# Altium PCB NB3000XN.PcbDoc (part 53 of 71)
Units mil, origin at the board's own origin, x right, y up, seen from the top; angles counter-clockwise.
Board outline 9527.56 x 6929.77 mil, 6 copper layers (Top Layer, GND+SHIELD, MidLayer1, MidLayer2, P2 - 3V3+5V0, Bottom Layer), stack 62.375 mil thick; 832 components, 1027 nets, 4655 pads, 4981 vias.
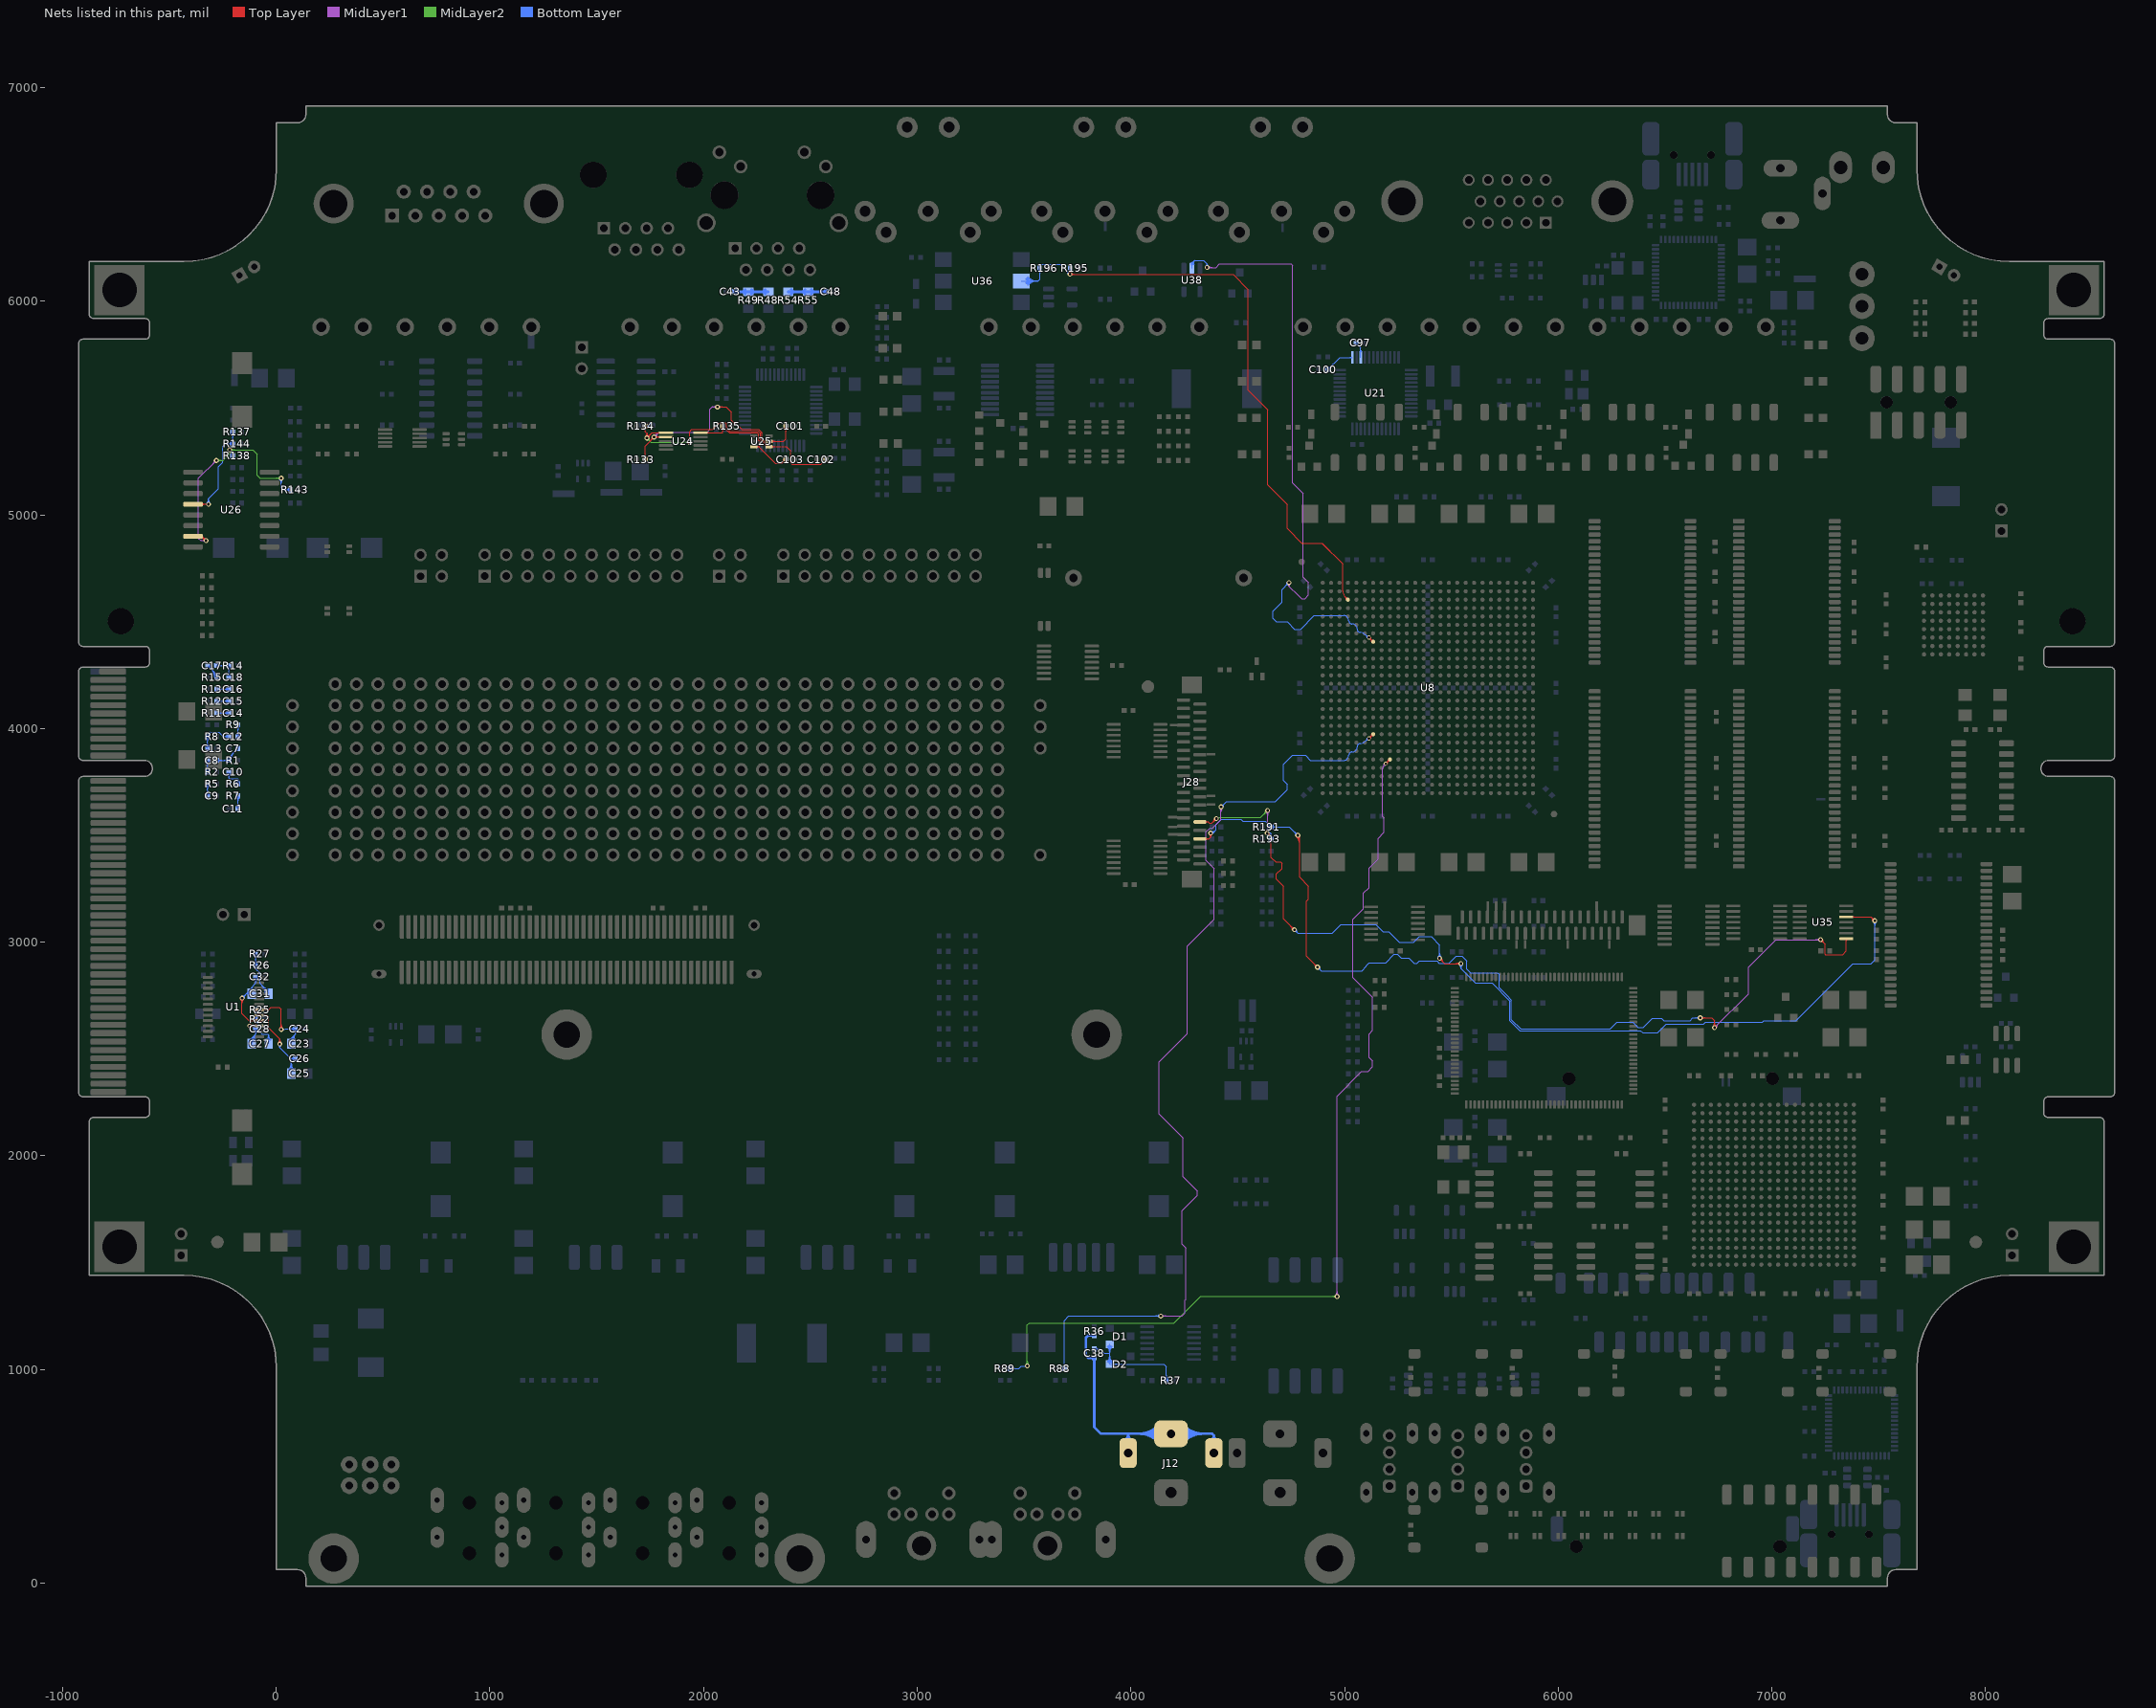
[diagram p57: the nets of this part, all layers, seen from the top]

## Via types
v1: diameter 23, hole 11.81, Top Layer to Bottom Layer, 3672 vias
v2: diameter 26, hole 11.81, Top Layer to Bottom Layer, 461 vias
v3: diameter 19, hole 11.81, Top Layer to Bottom Layer, tented both sides, 396 vias
v4: diameter 23.62, hole 11.81, Top Layer to Bottom Layer, 288 vias
v5: diameter 20, hole 11.81, Top Layer to Bottom Layer, 91 vias
v6: diameter 23, hole 11.81, Top Layer to Bottom Layer, tented both sides, 50 vias
v7: diameter 31, hole 11.81, Top Layer to Bottom Layer, 15 vias
v8: diameter 27.56, hole 11.81, Top Layer to Bottom Layer, tented both sides, 4 vias
v9: diameter 29, hole 11.81, Top Layer to Bottom Layer, 3 vias
v10: diameter 21, hole 11.81, Top Layer to Bottom Layer, 1 vias

## Nets (pads, with @x,y where several pads share a name; then routed paths per layer and width w, separated by ;. In a path a pad name is that pad's centre, name@x,y a point inside that pad or via, vN(x,y) a via of type N, cw(c..) or ccw(c..) an arc to the next point about the centre after c; other vN are vias at no path point) (continued)
LEDS#.LED7.GREEN: J28.30 R193.2 U35.12 | length 5428
  Top Layer w4: J28.30@4323.39,3562.99 4361.19,3562.99 4367.34,3556.84 4378.66,3556.84 v1(4400.52,3578.71) ; J28.30@4349.67,3558.84 cw(c4359.69,3548.81) 4359.69,3562.99 cw(c4359.69,3577.17) J28.30@4349.67,3567.15 ; v1@4391.02,3578.71 cw(c4368.09,3578.71) 4384.31,3562.49 cw(c4400.52,3546.27) v1@4400.52,3569.21 ; v1@4395.02,3578.71 cw(c4381.75,3578.71) 4391.14,3569.32 cw(c4400.52,3559.93) v1@4400.52,3573.21 ; v1@4637.52,3501.54 cw(c4637.52,3478.61) 4653.74,3494.82 cw(c4669.96,3511.04) v1@4647.02,3511.04 ; v1@4637.52,3505.54 cw(c4637.52,3492.26) 4646.91,3501.65 cw(c4656.3,3511.04) v1@4643.02,3511.04 ; v1(4637.52,3511.04) 4657.19,3491.37 4657.19,3396.73 4678.88,3375.04 4700.9,3375.04 4706.86,3369.08 4706.86,3345.37 4681.86,3320.37 4681.86,3296.04 4715.19,3262.71 4715.19,3108.37 v1(4765.19,3058.37) ; v1@4755.69,3058.37 ccw(c4732.76,3058.37) 4748.97,3074.59 ccw(c4765.19,3090.81) v1@4765.19,3067.87 ; v1@4759.69,3058.37 ccw(c4746.41,3058.37) 4755.8,3067.76 ccw(c4765.19,3077.15) v1@4765.19,3063.87 ; v1@5445,2915.5 cw(c5445,2893.02) 5460.9,2908.92 ; v1@5445,2919.5 cw(c5445,2906.68) 5454.07,2915.74 ; v1(5445,2925) 5445,2924.81 5469.77,2900.04 v1(5544.52,2900.04) ; v1@5450.5,2925 ccw(c5464.23,2925) 5454.52,2915.29 ; v1@5454.5,2925 ccw(c5477.89,2925) 5461.35,2908.46 ; v1@5537.81,2893.32 ccw(c5521.59,2877.11) 5521.59,2900.04 ccw(c5521.59,2922.98) v1@5537.81,2906.76 ; v1@5540.64,2896.15 ccw(c5531.25,2886.76) 5531.25,2900.04 ccw(c5531.25,2913.32) v1@5540.64,2903.93 ; U35.12@7348.5,3118.82 7463.75,3118.82 v1(7481.86,3100.71) ; U35.12@7377.81,3115.99 cw(c7384.64,3109.16) 7384.64,3118.82 cw(c7384.64,3128.48) U35.12@7377.81,3121.65 ; v1@7472.36,3100.71 ccw(c7449.42,3100.71) 7465.64,3116.93 ccw(c7481.86,3133.14) v1@7481.86,3110.21 ; v1@7476.36,3100.71 ccw(c7463.08,3100.71) 7472.47,3110.1 ccw(c7481.86,3119.49) v1@7481.86,3106.21
  MidLayer1 w4: v1@4630.81,3517.76 ccw(c4608.15,3540.41) 4640.19,3540.41 ; v1@4633.47,3609.99 cw(c4617.26,3593.77) 4640.19,3593.77 cw(c4663.13,3593.77) v1@4646.91,3609.99 ; v1@4633.64,3514.93 ccw(c4617.81,3530.76) 4640.19,3530.76 ; v1@4636.3,3612.82 cw(c4626.91,3603.43) 4640.19,3603.43 cw(c4653.47,3603.43) v1@4644.08,3612.82 ; v1(4637.52,3511.04) 4640.19,3513.71 v1(4640.19,3616.71) ; 4640.19,3527.54 ccw(c4654.02,3527.54) v1@4644.24,3517.76
  MidLayer2 w4: v1(4400.52,3578.71) 4405.19,3583.37 4606.86,3583.37 v1(4640.19,3616.71) ; v1@4630.69,3616.71 cw(c4607.76,3616.71) 4623.97,3600.49 cw(c4640.19,3584.27) v1@4640.19,3607.21 ; v1@4634.69,3616.71 cw(c4621.41,3616.71) 4630.8,3607.32 cw(c4640.19,3597.93) v1@4640.19,3611.21
  Bottom Layer w4: v1(4637.52,3511.04) 4654.19,3511.04 ; v1@4645.7,3506.2 cw(c4654.19,3501.17) 4654.19,3511.04 ; v1@4645.7,3515.88 ccw(c4654.19,3520.91) 4654.19,3511.04 ; R193.2@4649.59,3490.21 ccw(c4633.68,3506.12) 4656.18,3506.12 ccw(c4678.68,3506.11) R193.2@4662.77,3490.21 ; R193.2@4652.42,3487.38 ccw(c4643.34,3496.46) 4656.18,3496.46 ccw(c4669.02,3496.46) R193.2@4659.94,3487.38 ; R193.2@4656.18,3483.12 4656.18,3509.05 4654.19,3511.04 ; v1@4765.19,3048.87 cw(c4765.19,3025.94) 4781.41,3042.16 cw(c4797.63,3058.37) v1@4774.69,3058.37 ; v1@4765.19,3052.87 cw(c4765.19,3039.6) 4774.58,3048.99 cw(c4783.97,3058.37) v1@4770.69,3058.37 ; v1(4765.19,3058.37) 4781.86,3041.71 4941.9,3041.71 4983.56,3083.37 5146.54,3083.37 5179.88,3050.04 5206.86,3050.04 5256.86,3000.04 5323.52,3000.04 5341.48,3018 5349.36,3025.87 5405.77,3025.87 5445,2986.65 v1(5445,2925) ; v1@5438.28,2931.72 ccw(c5422.06,2947.93) 5445,2947.93 ccw(c5467.93,2947.93) v1@5451.72,2931.72 ; v1@5441.11,2928.89 ccw(c5431.72,2938.28) 5445,2938.28 ccw(c5458.28,2938.28) v1@5448.89,2928.89 ; v1@5537.81,2893.32 cw(c5521.59,2877.11) 5544.52,2877.11 cw(c5567.46,2877.11) v1@5551.24,2893.32 ; v1@5540.64,2896.15 cw(c5531.25,2886.76) 5544.52,2886.76 cw(c5557.8,2886.76) v1@5548.41,2896.15 ; v1(5544.52,2900.04) 5544.52,2875.48 5611.63,2808.37 5690.19,2808.37 5773.52,2725.04 5773.52,2633.37 5821.19,2585.71 6385.48,2585.71 6395.48,2575.71 6445,2575.71 6465.86,2575.71 6506.86,2616.71 6680.52,2616.71 6690.19,2626.37 6956.94,2626.37 6963.94,2633.37 7112.21,2633.37 7378.88,2900.04 7465.19,2900.04 7481.86,2916.71 v1(7481.86,3100.71) ; v1@7475.14,3093.99 cw(c7458.92,3077.77) 7481.86,3077.77 cw(c7504.79,3077.77) v1@7488.57,3093.99 ; v1@7477.97,3096.82 cw(c7468.58,3087.43) 7481.86,3087.43 cw(c7495.14,3087.43) v1@7485.75,3096.82
LEDS#.LED7.RED: J28.34 R191.2 U35.8 | length 5342.9
  Top Layer w4: J28.34@4323.39,3484.25 4365.52,3484.25 4373.52,3492.25 ; J28.34@4349.67,3480.1 cw(c4359.69,3470.07) 4359.69,3484.25 cw(c4359.69,3498.43) J28.34@4349.67,3488.41 ; v1@4367.89,3503.39 cw(c4359.7,3492.25) 4373.52,3492.25 ; v1(4373.52,3511.04) 4373.52,3492.25 ; v1@4379.16,3503.39 ccw(c4387.35,3492.25) 4373.52,3492.25 ; v1@4775.14,3493.32 cw(c4738.8,3456.99) 4790.19,3456.99 ; v1@4777.97,3496.15 cw(c4748.46,3466.64) 4790.19,3466.64 ; v1@4780.8,3498.98 cw(c4758.12,3476.3) 4790.19,3476.3 ; v1(4781.86,3500.04) 4790.19,3491.71 4790.19,3304.02 4831.52,3262.69 4831.52,3201.69 4822.86,3193.02 4822.86,2934.04 v1(4873.52,2883.37) ; v1@4783.62,3501.81 cw(c4767.78,3485.96) 4790.19,3485.96 ; v1@4864.02,2883.37 ccw(c4841.09,2883.37) 4857.31,2899.59 ccw(c4873.52,2915.81) v1@4873.52,2892.87 ; v1@4868.02,2883.37 ccw(c4854.75,2883.37) 4864.14,2892.76 ccw(c4873.52,2902.15) v1@4873.52,2888.87 ; v1(6665.19,2645.71) 6719.29,2645.71 6731.86,2633.14 v1(6731.86,2600.04) ; v1@6669.08,2641.82 cw(c6678.47,2632.43) 6678.47,2645.71 cw(c6678.47,2658.99) v1@6669.08,2649.6 ; v1@6671.91,2638.99 cw(c6688.13,2622.77) 6688.13,2645.71 cw(c6688.13,2668.64) v1@6671.91,2652.43 ; v1@6725.14,2606.76 ccw(c6708.92,2622.98) 6731.86,2622.98 ccw(c6754.79,2622.98) v1@6738.57,2606.76 ; v1@6727.97,2603.93 ccw(c6718.58,2613.32) 6731.86,2613.32 ccw(c6745.14,2613.32) v1@6735.75,2603.93 ; v1@7228.19,3002.54 cw(c7228.19,2979.61) 7244.41,2995.82 cw(c7260.63,3012.04) v1@7237.69,3012.04 ; v1@7228.19,3006.54 cw(c7228.19,2993.26) 7237.58,3002.65 cw(c7246.97,3012.04) v1@7233.69,3012.04 ; v1(7228.19,3012.04) 7248.52,2991.71 7248.52,2943.37 7250.19,2941.71 7331.86,2941.71 7348.52,2958.37 U35.8@7348.5,3016.46 ; U35.8@7345.68,3013.63 cw(c7338.8,3006.75) 7348.52,3006.75 ; 7348.52,3006.85 cw(c7358.11,3006.85) U35.8@7351.33,3013.63 ; U35.8@7348.5,3016.46 7348.52,3016.71 U35.8@7348.5,3016.46
  MidLayer1 w4: v1(6731.86,2600.04) 6890.19,2758.37 6890.19,2882.77 7019.46,3012.04 v1(7228.19,3012.04) ; v1@6731.86,2605.54 ccw(c6731.86,2618.82) 6741.25,2609.43 ccw(c6750.64,2600.04) v1@6737.36,2600.04 ; v1@6731.86,2609.54 ccw(c6731.86,2632.48) 6748.07,2616.26 ccw(c6764.29,2600.04) v1@6741.36,2600.04 ; v1@7221.47,3005.32 ccw(c7205.26,2989.11) 7205.26,3012.04 ccw(c7205.26,3034.98) v1@7221.47,3018.76 ; v1@7224.3,3008.15 ccw(c7214.91,2998.76) 7214.91,3012.04 ccw(c7214.91,3025.32) v1@7224.3,3015.93
  Bottom Layer w4: v1(4373.52,3511.04) 4384.52,3511.04 4398.52,3525.04 ; v1@4374.02,3512.46 ccw(c4378.92,3526.59) 4389.5,3516.01 ; v1@4375.33,3516.24 ccw(c4381.25,3533.29) 4394.01,3520.53 ; v1@4376.64,3520.02 ccw(c4383.57,3539.99) 4398.52,3525.04 ; 4639.43,3556.75 ccw(c4656.18,3573.5) R191.2@4656.18,3549.81 ; 4640.62,3555.56 cw(c4625.55,3540.49) R191.2@4646.86,3540.49 ; R191.2@4646.26,3549.92 ccw(c4656.18,3559.84) R191.2@4656.18,3545.81 ; R191.2@4647.45,3548.73 cw(c4639.21,3540.49) R191.2@4650.86,3540.49 ; R191.2@4659.94,3536.24 cw(c4669.02,3527.16) 4669.02,3540 cw(c4669.02,3552.84) R191.2@4659.94,3543.76 ; R191.2@4662.77,3533.41 cw(c4678.68,3517.5) 4678.68,3540 cw(c4678.68,3562.5) R191.2@4662.77,3546.59 ; v1@4772.36,3500.04 ccw(c4749.42,3500.04) 4765.64,3516.26 ccw(c4781.86,3532.48) v1@4781.86,3509.54 ; v1@4776.36,3500.04 ccw(c4763.08,3500.04) 4772.47,3509.43 ccw(c4781.86,3518.82) v1@4781.86,3505.54 ; v1(4781.86,3500.04) 4741.9,3540 R191.2@4656.18,3540 4629.47,3566.71 4523.52,3566.71 4515.19,3575.04 4423.52,3575.04 4398.52,3550.04 4398.52,3525.04 ; v1@4873.52,2873.87 cw(c4873.52,2850.94) 4889.74,2867.16 cw(c4905.96,2883.37) v1@4883.02,2883.37 ; v1@4873.52,2877.87 cw(c4873.52,2864.6) 4882.91,2873.99 cw(c4892.3,2883.37) v1@4879.02,2883.37 ; v1(4873.52,2883.37) 4890.52,2866.37 5081.56,2866.37 5102.81,2887.62 5102.81,2891.1 5114.52,2902.81 5192.62,2902.81 5232.62,2942.81 5247.38,2942.81 5265.31,2924.88 5302.27,2924.88 5325.61,2901.54 5340.11,2901.54 5350.36,2911.79 5433.46,2911.79 5443.06,2902.19 5489.36,2902.19 5522.17,2935 5550,2935 5573.19,2911.81 5573.19,2874.04 5589.86,2857.37 5716.19,2857.37 5723.52,2850.04 5723.52,2786.37 5757.18,2752.72 5781.52,2728.37 5781.52,2636.69 5824.5,2593.71 6243.19,2593.71 6274.52,2625.04 6348.52,2625.04 6373.52,2600.04 6398.52,2600.04 6441.86,2643.37 6442.69,2644.2 6484.34,2644.2 6495.5,2633.04 6617.33,2633.04 6630,2645.71 v1(6665.19,2645.71) ; v1@6658.47,2638.99 ccw(c6642.26,2622.77) 6642.26,2645.71 ccw(c6642.26,2668.64) v1@6658.47,2652.43 ; v1@6661.3,2641.82 ccw(c6651.91,2632.43) 6651.91,2645.71 ccw(c6651.91,2658.99) v1@6661.3,2649.6
LINEAOUT_L: R137.2 R144.1 U26.4 | length 757.1
  Top Layer w4: U26.4@-389.13,5050 -332.81,5050 ; U26.4@-351.46,5046 cw(c-342.13,5037.13) -342.13,5050 cw(c-342.13,5062.87) U26.4@-351.46,5054 ; U26.4@-348.56,5043.24 cw(c-332.81,5028.28) -332.81,5050 ; U26.4@-348.56,5056.76 ccw(c-332.81,5071.72) -332.81,5050 ; -332.77,5050.04 v1(-317.14,5050.04)
  Bottom Layer w4: v1@-323.86,5056.76 ccw(c-340.08,5072.98) -317.14,5072.98 ccw(c-294.21,5072.98) v1@-310.43,5056.76 ; v1@-321.03,5053.93 ccw(c-330.42,5063.32) -317.14,5063.32 ccw(c-303.86,5063.32) v1@-313.25,5053.93 ; v1(-317.14,5050.04) -317.14,5075 -270,5122.14 -270,5225 -250,5245 -250,5320 -237.42,5332.58 R144.1@-203.21,5332.58 R137.2@-203.21,5388.42 ; R144.1@-209.8,5325.99 ccw(c-225.71,5310.08) -225.71,5332.58 ccw(c-225.71,5355.08) R144.1@-209.8,5339.17 ; R144.1@-209.8,5339.66 ccw(c-225.71,5355.57) -203.21,5355.57 ccw(c-180.71,5355.57) R144.1@-196.62,5339.66 ; R137.2@-209.8,5381.33 cw(c-225.71,5365.43) -203.21,5365.43 cw(c-180.71,5365.43) R137.2@-196.62,5381.33 ; R144.1@-206.97,5328.82 ccw(c-216.05,5319.74) -216.05,5332.58 ccw(c-216.05,5345.42) R144.1@-206.97,5336.34 ; R144.1@-206.97,5336.84 ccw(c-216.05,5345.91) -203.21,5345.91 ccw(c-190.37,5345.91) R144.1@-199.45,5336.84 ; R137.2@-206.97,5384.16 cw(c-216.05,5375.08) -203.21,5375.08 cw(c-190.37,5375.08) R137.2@-199.45,5384.16
LINEAOUT_R: R138.2 R143.1 U26.7 | length 1685.2
  Top Layer w4: U26.7@-395,4900 U26.7@-389.13,4900 -348,4900 v1(-328,4880) ; U26.7@-355.67,4894.19 cw(c-355.67,4861.64) v1@-332.66,4884.66 ; U26.7@-355.67,4898.19 cw(c-355.67,4875.3) -339.49,4891.49 ; U26.7@-345.86,4900 ccw(c-340.69,4900) U26.7@-344.34,4896.34 ; v1@-337.5,4880 ccw(c-360.44,4880) -344.22,4896.22 ccw(c-328,4912.43) v1@-328,4889.5 ; v1@-333.5,4880 ccw(c-346.78,4880) -337.39,4889.39 ccw(c-328,4898.78) v1@-328,4885.5
  MidLayer1 w4: v1@-334.72,4873.28 ccw(c-350.94,4857.06) -350.94,4880 ccw(c-350.94,4902.93) v1@-334.72,4886.72 ; v1@-331.89,4876.11 ccw(c-341.28,4866.72) -341.28,4880 ccw(c-341.28,4893.28) v1@-331.89,4883.89 ; v1(-328,4880) -354,4880 -364,4890 -364,5171 v1(-280,5255) ; v1@-289.5,5255 cw(c-312.44,5255) -296.22,5238.78 cw(c-280,5222.56) v1@-280,5245.5 ; v1@-285.5,5255 cw(c-298.78,5255) -289.39,5245.61 cw(c-280,5236.22) v1@-280,5249.5
  MidLayer2 w4: v1(-280,5255) -248.14,5255 -217.81,5285.33 ; v1@-276.11,5251.11 cw(c-266.72,5241.72) -266.72,5255 cw(c-266.72,5268.28) v1@-276.11,5258.89 ; v1@-273.28,5248.28 cw(c-257.07,5232.06) -257.07,5255 cw(c-257.07,5277.93) v1@-273.28,5261.72 ; v1@-223.52,5296.78 cw(c-232.14,5285.33) -217.81,5285.33 ; v1@-213.92,5300.49 cw(c-204.53,5291.1) -204.53,5304.37 cw(c-204.53,5317.65) v1@-213.92,5308.26 ; v1@-212.1,5296.78 ccw(c-203.48,5285.33) -217.81,5285.33 ; v1@-211.09,5297.66 cw(c-194.87,5281.44) -194.87,5304.37 cw(c-194.87,5327.31) v1@-211.09,5311.09 ; v1@16.81,5164.99 ccw(c0.59,5148.77) 0.59,5171.71 ccw(c0.59,5194.64) v1@16.81,5178.43 ; v1@19.64,5167.82 ccw(c10.25,5158.43) 10.25,5171.71 ccw(c10.25,5184.99) v1@19.64,5175.6 ; v1(23.52,5171.71) -76.71,5171.71 -90,5185 -90,5284.37 -110,5304.37 v1(-217.81,5304.37) -217.81,5285.33
  Bottom Layer w4: v1@-218.11,5304.67 cw(c-241.69,5281.09) R138.2@-208.5,5277.77 ; v1(-217.81,5304.37) -203.21,5289.77 R138.2@-203.21,5276.75 ; v1@-212.14,5298.7 cw(c-230.84,5280) R138.2@-204.52,5277.37 ; -206.17,5292.73 cw(c-219.98,5278.92) R138.2@-200.54,5276.97 ; v1@16.81,5164.99 cw(c0.59,5148.77) 23.52,5148.77 cw(c46.46,5148.77) v1@30.24,5164.99 ; v1@19.64,5167.82 cw(c10.25,5158.43) 23.52,5158.43 cw(c36.8,5158.43) v1@27.41,5167.82 ; v1(23.52,5171.71) 23.52,5128.65 33.52,5118.65 R143.1@66.28,5118.65 ; R143.1@59.69,5112.06 ccw(c43.78,5096.16) 43.78,5118.65 ccw(c43.78,5141.15) R143.1@59.69,5125.24 ; R143.1@62.52,5114.89 ccw(c53.44,5105.81) 53.44,5118.65 ccw(c53.44,5131.5) R143.1@62.52,5122.41
MIDI.MIDI_RX: R195.1 R196.2 U8.C4 U36.5 | length 3637.6
  Top Layer w4: v1(3715.19,6127.37) 3717.52,6125.04 4425,6125.04 4459.96,6125.04 4478.88,6125.04 4548.52,6055.39 4548.52,5708.37 4548.52,5695 4548.52,5583.37 4640.19,5491.71 4640.19,5140.71 4731.86,5049.04 4731.86,4936.35 4800.5,4867.71 4894.79,4867.71 ; v1@3719.08,6131.26 ccw(c3734.1,6146.29) 3734.1,6125.04 ; v1@3721.91,6120.66 cw(c3732.49,6110.07) 3732.49,6125.04 ; v1@3721.91,6134.09 ccw(c3743.76,6155.94) 3743.76,6125.04 ; 4931.61,4831.02 4894.92,4867.71 4894.79,4867.71 ; 4894.79,4867.71 4896.29,4866.21 4896.42,4866.21 4992.12,4770.51 4992.12,4724.74 4992.12,4720 4992.12,4710 4992.12,4643.27 ; 4992.12,4643.27 ccw(c5030.8,4643.27) 5003.45,4615.92 ; 4992.12,4643.27 ccw(c5030.8,4643.27) 5003.45,4615.92 ; 5003.45,4615.92 cw(c4990.92,4603.39) 5008.64,4603.39 ccw(c4990.92,4603.39) 5003.45,4615.92 ; 5003.45,4615.92 ccw(c5015.98,4628.45) 5015.98,4610.73 cw(c5015.98,4628.45) 5003.45,4615.92
  Bottom Layer w4: U36.5@3487.48,6095 3565.19,6095 ; U36.5@3505.28,6083.81 cw(c3529.93,6062.24) 3529.93,6095 cw(c3529.94,6127.76) U36.5@3505.28,6106.19 ; U36.5@3508.29,6081.17 cw(c3538.75,6054.53) 3538.75,6095 cw(c3538.75,6135.47) U36.5@3508.29,6108.83 ; U36.5@3511.3,6078.54 cw(c3547.56,6046.82) 3547.56,6095 cw(c3547.56,6143.18) U36.5@3511.3,6111.46 ; U36.5@3514.31,6075.91 cw(c3556.37,6039.12) 3556.37,6095 cw(c3556.37,6150.89) U36.5@3514.31,6114.09 ; U36.5@3517.32,6073.27 cw(c3565.19,6031.41) 3565.19,6095 ; U36.5@3517.32,6116.73 ccw(c3565.19,6158.59) 3565.19,6095 ; R196.2@3567.23,6147.92 cw(c3551.32,6132.01) 3573.82,6132.01 cw(c3596.32,6132.01) R196.2@3580.41,6147.92 ; R196.2@3569.13,6163.54 ccw(c3564.37,6171.71) 3573.82,6171.71 ; R196.2@3570.06,6150.75 cw(c3560.98,6141.67) 3573.82,6141.67 cw(c3586.66,6141.67) R196.2@3577.58,6150.75 ; R196.2@3578.51,6163.54 cw(c3583.27,6171.71) 3573.82,6171.71 ; v1@3705.69,6127.37 ccw(c3682.76,6127.37) 3698.97,6143.59 ccw(c3715.19,6159.81) v1@3715.19,6136.87 ; v1@3709.69,6127.37 ccw(c3696.41,6127.37) 3705.8,6136.76 ccw(c3715.19,6146.15) v1@3715.19,6132.87 ; R195.1@3713.04,6145.79 cw(c3711.25,6141.04) 3716.32,6141.04 ; R195.1@3716.32,6155 3716.32,6141.04 ; R195.1@3719.6,6145.79 ccw(c3721.39,6141.04) 3716.32,6141.04 ; 3565.19,6095 3573.82,6103.63 3573.82,6171.71 ; 3573.82,6171.71 3575.49,6173.37 3669.19,6173.37 v1(3715.19,6127.37) 3715.19,6139.91 3716.32,6141.04
MIDI.MIDI_TX: U8.H7 U38.2 | length 3354
  Top Layer w4: v3(5114.41,4426.22) U8.H7@5134.09,4406.54 ; U8.H7@5126.59,4406.54 ccw(c5108.49,4406.54) 5121.29,4419.34 ccw(c5134.09,4432.14) U8.H7@5134.09,4414.04 ; U8.H7@5126.75,4406.54 ccw(c5109.03,4406.54) 5121.56,4419.07 ccw(c5134.09,4431.6) U8.H7@5134.09,4413.88 ; 5127.21,4413.42 ccw(c5114.41,4400.61) 5114.41,4418.72 cw(c5114.41,4400.61) 5127.21,4413.42 ; 5127.21,4413.42 cw(c5140.02,4426.22) 5121.91,4426.22 ccw(c5140.02,4426.22) 5127.21,4413.42
  MidLayer1 w4: v1(4356.86,6158.37) 4398.37,6158.37 4415.37,6175.37 4750,6175.37 ; v1@4360.75,6154.49 cw(c4370.14,6145.1) 4370.14,6158.37 cw(c4370.14,6171.65) v1@4360.75,6162.26 ; v1@4363.57,6151.66 cw(c4379.79,6135.44) 4379.79,6158.37 cw(c4379.79,6181.31) v1@4363.57,6165.09 ; v1@4735.35,4675.2 cw(c4730.32,4666.71) 4740.19,4666.71 ; v1(4740.19,4683.37) 4740.19,4666.71 ; v1@4745.03,4675.2 ccw(c4750.06,4666.71) 4740.19,4666.71 ; 4750,6175 4757.69,6167.31 4757.69,5149.21 4806.86,5100.04 4806.86,4708.37 4831.86,4683.37 4831.86,4625.04 4815.19,4608.37 4798.52,4608.37 4781.86,4625.04 4740.19,4666.71
  Bottom Layer w4: U38.2@4285.84,6155.12 U38.2@4285.84,6168.71 ; U38.2@4285.84,6168.89 U38.2@4285.84,6168.71 ; U38.2@4287.51,6169.61 cw(c4298.99,6174.52) 4290.16,6183.34 ; U38.2@4291.19,6171.18 cw(c4304.85,6177.02) 4294.34,6187.53 ; U38.2@4294.86,6172.75 cw(c4310.71,6179.52) 4298.52,6191.71 ; v1@4352.02,6166.55 ccw(c4346.99,6175.04) 4356.86,6175.04 ; v1(4356.86,6158.37) 4356.86,6175.04 ; v1@4361.7,6166.55 cw(c4366.72,6175.04) 4356.86,6175.04 ; v1@4730.69,4683.37 cw(c4707.76,4683.37) 4723.97,4667.16 cw(c4740.19,4650.94) v1@4740.19,4673.87 ; v1@4734.69,4683.37 cw(c4721.41,4683.37) 4730.8,4673.99 cw(c4740.19,4664.6) v1@4740.19,4677.87 ; v1(4740.19,4683.37) 4706.86,4650.04 4706.86,4591.71 4665.19,4550.04 4665.19,4516.71 4681.86,4500.04 4731.86,4500.04 4766.86,4465.04 4795.04,4465.04 4858.73,4528.73 4860,4528.73 4870,4528.73 4996.3,4528.73 cw(c4996.3,4504.96) 5020.07,4504.96 ccw(c5035.67,4504.96) 5035.67,4489.36 cw(c5035.67,4465.59) 5059.44,4465.59 ccw(c5075.04,4465.59) 5075.04,4449.99 cw(c5075.04,4426.22) 5091.85,4443.03 5099.58,4436.61 ; v3@5107.02,4424.92 ccw(c5089.19,4421.77) 5099.58,4436.61 ; v3@5113.11,4433.61 cw(c5109.96,4451.44) 5099.58,4436.61 ; U38.2@4285.84,6168.71 4285.52,6168.71 4285.52,6178.71 4298.52,6191.71 ; 4298.52,6191.71 4340.19,6191.71 4356.86,6175.04
MOUSE.CLOCK: R89.1 U8.AB9 | length 4861
  Top Layer w4: v3(5193.15,3835.67) U8.AB9@5212.83,3855.35 ; U8.AB9@5205.33,3855.35 cw(c5187.23,3855.35) 5200.03,3842.55 cw(c5212.83,3829.75) U8.AB9@5212.83,3847.85 ; U8.AB9@5205.49,3855.35 cw(c5187.77,3855.35) 5200.3,3842.82 cw(c5212.83,3830.29) U8.AB9@5212.83,3848.01 ; 5205.95,3848.47 cw(c5193.15,3861.28) 5193.15,3843.17 ccw(c5193.15,3861.28) 5205.95,3848.47 ; 5205.95,3848.47 ccw(c5218.76,3835.67) 5200.65,3835.67 cw(c5218.76,3835.67) 5205.95,3848.47
  MidLayer1 w4: v1@4958.47,1348.43 ccw(c4942.26,1364.64) 4965.19,1364.64 ccw(c4988.13,1364.64) v1@4971.91,1348.43 ; v1@4961.3,1345.6 ccw(c4951.91,1354.99) 4965.19,1354.99 ccw(c4978.47,1354.99) v1@4969.08,1345.6 ; v1(4965.19,1341.71) 4965.19,2279.73 5080.46,2395 5110.15,2395 5131.86,2416.71 5131.86,2443.39 5115.19,2460.06 5115.19,2569.94 5131.86,2586.61 5131.86,2741.71 5040.19,2833.37 5040.19,3107.69 5089.19,3156.69 5089.19,3230.73 5114.5,3256.04 5114.5,3346.37 5156.86,3388.73 5156.86,3486.35 5184.52,3514.02 5184.52,3581.02 5177.64,3587.9 5177.64,3660 5177.64,3670 5177.64,3718.62 5177.64,3812.16 cw(c5191.69,3812.16) 5181.76,3822.09 ; v3@5185.68,3835.02 cw(c5167.64,3833.44) 5181.51,3821.8 cw(c5195.38,3810.16) v3@5193.8,3828.2
  MidLayer2 w4: v1@3508.47,1023.43 ccw(c3492.26,1039.64) 3515.19,1039.64 ccw(c3538.13,1039.64) v1@3521.91,1023.43 ; v1@3511.3,1020.6 ccw(c3501.91,1029.99) 3515.19,1029.99 ccw(c3528.47,1029.99) v1@3519.08,1020.6 ; v1(3515.19,1016.71) 3515.19,1207.23 3525,1217.04 4202.04,1217.04 4326.71,1341.71 v1(4965.19,1341.71) ; v1@4958.47,1334.99 ccw(c4942.26,1318.77) 4942.26,1341.71 ccw(c4942.26,1364.64) v1@4958.47,1348.43 ; v1@4961.3,1337.82 ccw(c4951.91,1328.43) 4951.91,1341.71 ccw(c4951.91,1354.99) v1@4961.3,1345.6
  Bottom Layer w4: R89.1@3433.23,1005 3475,1005 3486.71,1016.71 v1(3515.19,1016.71) ; R89.1@3436.99,1001.24 cw(c3446.07,992.16) 3446.07,1005 cw(c3446.07,1017.84) R89.1@3436.99,1008.76 ; R89.1@3439.82,998.41 cw(c3455.73,982.5) 3455.73,1005 cw(c3455.73,1027.5) R89.1@3439.82,1011.59
MOUSE.DATA: R88.1 U8.W7 | length 4771.4
  Top Layer w4: v3(5114.41,3953.78) U8.W7@5134.09,3973.46 ; U8.W7@5126.59,3973.46 cw(c5108.49,3973.46) 5121.29,3960.66 cw(c5134.09,3947.86) U8.W7@5134.09,3965.96 ; U8.W7@5126.75,3973.46 cw(c5109.03,3973.46) 5121.56,3960.93 cw(c5134.09,3948.4) U8.W7@5134.09,3966.12 ; 5127.21,3966.58 cw(c5114.41,3979.39) 5114.41,3961.28 ccw(c5114.41,3979.39) 5127.21,3966.58 ; 5127.21,3966.58 ccw(c5140.02,3953.78) 5121.91,3953.78 cw(c5140.02,3953.78) 5127.21,3966.58
  MidLayer1 w4: v1(4139.96,1250.04) 4240.04,1250.04 4254,1264 4254,1324 4257.86,1327.86 4257.86,1556.54 4258,1556.69 4258,1568.19 4240.02,1586.16 4240.02,1743.96 4310.5,1814.44 4310.5,1835.56 4244,1902.06 4244,2083.31 4132.19,2195.12 4132.19,2439.67 4265.19,2572.67 4265.19,2982.41 4390.19,3107.41 4390.19,3345.71 4352.52,3383.37 4352.52,3516.71 4369.19,3533.37 4381.86,3533.37 4422.19,3573.71 v1(4422.19,3633.37) ; v1@4143.85,1246.15 cw(c4153.24,1236.76) 4153.24,1250.04 cw(c4153.24,1263.32) v1@4143.85,1253.93 ; v1@4146.68,1243.32 cw(c4162.89,1227.11) 4162.89,1250.04 cw(c4162.89,1272.98) v1@4146.68,1256.76 ; v1@4415.47,3626.66 cw(c4399.26,3610.44) 4422.19,3610.44 cw(c4445.13,3610.44) v1@4428.91,3626.66 ; v1@4418.3,3629.49 cw(c4408.91,3620.1) 4422.19,3620.1 cw(c4435.47,3620.1) v1@4426.08,3629.49
  Bottom Layer w4: R88.1@3689.13,1005 3689.13,1229.13 3710.04,1250.04 v1(4139.96,1250.04) ; v1@4133.24,1243.32 ccw(c4117.02,1227.11) 4117.02,1250.04 ccw(c4117.02,1272.98) v1@4133.24,1256.76 ; v1@4136.07,1246.15 ccw(c4126.68,1236.76) 4126.68,1250.04 ccw(c4126.68,1263.32) v1@4136.07,1253.93 ; v1(4422.19,3633.37) 4447.19,3658.37 4675.52,3658.37 4732.11,3714.96 4733.22,3716.07 4733.22,3739.34 4715.19,3757.37 4715.19,3833.37 4756.86,3875.04 4816.42,3875.04 4840.19,3851.27 4855.26,3851.27 4860,3851.27 4870,3851.27 4879.78,3851.27 4938.04,3851.27 4996.3,3851.27 ccw(c4996.3,3875.04) 5020.07,3875.04 cw(c5035.67,3875.04) 5035.67,3890.64 ccw(c5035.67,3914.41) 5059.44,3914.41 cw(c5075.04,3914.41) 5075.04,3930.01 ccw(c5075.04,3953.78) 5091.85,3936.97 5099.58,3943.39 ; v1@4422.19,3638.87 ccw(c4422.19,3652.15) 4431.58,3642.76 ccw(c4440.97,3633.37) v1@4427.69,3633.37 ; v1@4422.19,3642.87 ccw(c4422.19,3665.81) 4438.41,3649.59 ccw(c4454.63,3633.37) v1@4431.69,3633.37 ; v3@5107.02,3955.08 cw(c5089.19,3958.23) 5099.58,3943.39 ; v3@5113.11,3946.39 ccw(c5109.96,3928.56) 5099.58,3943.39
NetC7_1: C7.1 C8.2 R1.2 | length 440.8
  Bottom Layer w4: C8.2@-279.33,3851.36 R1.2@-221.18,3851.36 -221.18,3864.97 ; C8.2@-275.22,3847.25 cw(c-265.3,3837.34) -265.3,3851.36 ; C8.2@-275.22,3855.47 ccw(c-265.3,3865.39) -265.3,3851.36 ; C8.2@-272.39,3844.43 cw(c-255.65,3827.68) -255.65,3851.36 cw(c-255.64,3875.05) C8.2@-272.39,3858.3 ; R1.2@-227.77,3844.77 ccw(c-243.68,3828.87) -243.68,3851.36 ccw(c-243.68,3873.86) R1.2@-227.77,3857.95 ; R1.2@-224.94,3847.6 ccw(c-234.02,3838.52) -234.02,3851.36 ccw(c-234.02,3864.21) R1.2@-224.94,3855.12 ; R1.2@-224.24,3860.66 ccw(c-225.74,3864.97) -221.18,3864.97 ; R1.2@-223.86,3851.86 cw(c-198.68,3851.86) -216.49,3869.66 ; R1.2@-219.86,3851.86 cw(c-185.02,3851.86) -209.66,3876.49 ; R1.2@-218.12,3860.66 cw(c-216.62,3864.97) -221.18,3864.97 ; R1.2@-215.86,3851.86 cw(c-171.37,3851.86) -202.83,3883.32 ; R1.2@-211.86,3851.86 cw(c-157.71,3851.86) -196,3890.15 ; C7.1@-189.14,3906.82 cw(c-212.83,3906.82) -196.08,3890.07 cw(c-179.33,3873.32) C7.1@-179.33,3897.01 ; C7.1@-185.14,3906.82 cw(c-199.17,3906.82) -189.25,3896.9 cw(c-179.33,3886.98) C7.1@-179.33,3901.01 ; C7.1@-179.33,3906.82 -221.18,3864.97
NetC8_1: C8.1 R2.1 | length 170.4
  Bottom Layer w4: R2.1@-327.77,3802.99 ccw(c-343.68,3818.9) -321.18,3818.9 ccw(c-298.68,3818.9) R2.1@-314.59,3802.99 ; C8.1@-327.61,3844.43 cw(c-343.12,3828.91) -321.18,3828.91 ; R2.1@-324.94,3800.16 ccw(c-334.02,3809.24) -321.18,3809.24 ccw(c-308.34,3809.24) R2.1@-317.42,3800.16 ; C8.1@-324.78,3847.25 cw(c-333.46,3838.57) -321.18,3838.57 ; R2.1@-321.18,3795.91 -321.18,3850.85 C8.1@-320.67,3851.36 ; -321.18,3826.44 cw(c-295.75,3826.44) C8.1@-313.73,3844.43 ; -321.18,3836.1 cw(c-305.4,3836.1) C8.1@-316.56,3847.25
NetC9_1: C9.1 R5.1 | length 169.2
  Bottom Layer w4: R5.1@-327.77,3733.37 cw(c-343.68,3717.46) -321.18,3717.46 cw(c-298.68,3717.47) R5.1@-314.59,3733.37 ; C9.1@-327.54,3692 ccw(c-343.6,3708.37) -320.67,3708.37 ; R5.1@-324.94,3736.2 cw(c-334.02,3727.12) -321.18,3727.12 cw(c-308.34,3727.12) R5.1@-317.42,3736.2 ; C9.1@-324.74,3689.15 ccw(c-334.25,3698.84) -320.67,3698.84 ccw(c-307.08,3698.84) C9.1@-316.6,3689.15 ; R5.1@-321.18,3740.45 -321.18,3708.89 -320.67,3708.37 ; C9.1@-320.67,3685 -320.67,3708.37 ; C9.1@-313.8,3692 cw(c-297.73,3708.37) -320.67,3708.37
NetC10_1: C10.1 R6.1 | length 209.5
  Bottom Layer w4: C10.1@-227.61,3788.97 cw(c-244.36,3772.22) -220.67,3772.22 cw(c-196.98,3772.22) C10.1@-213.73,3788.97 ; C10.1@-224.78,3791.8 cw(c-234.7,3781.88) -220.67,3781.88 cw(c-206.64,3781.88) C10.1@-216.56,3791.8 ; C10.1@-220.67,3795.91 -220.67,3768.2 -218.73,3766.27 -181.27,3766.27 -178.82,3763.82 R6.1@-178.82,3740.45 ; R6.1@-185.41,3747.54 ccw(c-201.32,3763.44) -178.82,3763.44 ccw(c-156.32,3763.44) R6.1@-172.23,3747.54 ; R6.1@-182.58,3744.71 ccw(c-191.66,3753.79) -178.82,3753.79 ccw(c-165.98,3753.79) R6.1@-175.06,3744.71
NetC11_1: C11.1 R7.1 | length 175
  Bottom Layer w4: C11.1@-186.27,3631.94 ccw(c-204.25,3649.92) -178.82,3649.92 ; R7.1@-185.41,3677.92 cw(c-201.32,3662.01) -178.82,3662.01 cw(c-156.32,3662.01) R7.1@-172.23,3677.92 ; C11.1@-183.44,3629.11 ccw(c-194.6,3640.26) -178.82,3640.26 ; R7.1@-182.58,3680.75 cw(c-191.66,3671.67) -178.82,3671.67 cw(c-165.98,3671.67) R7.1@-175.06,3680.75 ; C11.1@-179.33,3625 -178.82,3625.51 R7.1@-178.82,3685 ; -178.82,3637.79 ccw(c-166.54,3637.79) C11.1@-175.22,3629.11 ; -178.82,3647.45 ccw(c-156.88,3647.45) C11.1@-172.39,3631.94
NetC12_1: C12.1 R9.1 | length 133.7
  Bottom Layer w4: R9.1@-185.41,4010.65 cw(c-201.32,3994.74) -178.82,3994.74 cw(c-156.32,3994.74) R9.1@-172.23,4010.65 ; C12.1@-184.56,3970.58 ccw(c-190.51,3980.04) -179.33,3980.04 ; R9.1@-182.58,4013.47 cw(c-191.66,4004.39) -178.82,4004.39 cw(c-165.98,4004.39) R9.1@-175.06,4013.47 ; C12.1@-179.33,3962.27 -179.33,3980.04 ; R9.1@-178.82,4017.73 -178.82,3980.55 -179.33,3980.04 ; C12.1@-174.1,3970.58 cw(c-168.15,3980.04) -179.33,3980.04
NetC12_2: C12.2 C13.1 R8.2 | length 399
  Bottom Layer w4: R8.2@-327.77,3955.19 cw(c-343.68,3939.28) -321.18,3939.28 cw(c-298.68,3939.28) R8.2@-314.59,3955.19 ; C13.1@-327.61,3913.76 ccw(c-343.12,3929.27) -321.18,3929.27 ; R8.2@-324.94,3958.02 cw(c-334.02,3948.94) -321.18,3948.94 cw(c-308.34,3948.94) R8.2@-317.42,3958.02 ; C13.1@-324.78,3910.93 ccw(c-333.46,3919.61) -321.18,3919.61 ; -321.18,3922.08 ccw(c-305.41,3922.08) C13.1@-316.56,3910.93 ; -321.18,3931.74 ccw(c-295.75,3931.74) C13.1@-313.73,3913.76 ; C13.1@-320.67,3906.82 -321.18,3907.33 R8.2@-321.18,3962.27 -321.18,3970.38 -308.19,3983.37 ; R8.2@-319.93,3963.18 cw(c-309.7,3966.61) -317.33,3974.23 ; R8.2@-316.14,3964.45 cw(c-302.85,3968.9) -312.76,3978.8 ; R8.2@-312.34,3965.72 cw(c-296,3971.19) -308.19,3983.37 ; C12.2@-227.61,3955.34 ccw(c-244.35,3938.59) -244.35,3962.27 ccw(c-244.36,3985.96) C12.2@-227.61,3969.21 ; C12.2@-224.78,3958.16 ccw(c-234.7,3948.25) -234.7,3962.27 ccw(c-234.7,3976.3) C12.2@-224.78,3966.38 ; C12.2@-220.67,3962.27 -247.04,3962.27 -268.14,3983.37 -308.19,3983.37
NetC14_1: C14.1 R11.1 | length 172.9
  Bottom Layer w4: R11.1@-278.82,4073.18 C14.1@-220.67,4073.18 ; R11.1@-275.06,4069.42 cw(c-265.98,4060.34) -265.98,4073.18 cw(c-265.98,4086.02) R11.1@-275.06,4076.94 ; R11.1@-272.23,4066.59 cw(c-256.32,4050.69) -256.32,4073.18 cw(c-256.32,4095.68) R11.1@-272.23,4079.77 ; C14.1@-227.61,4066.24 ccw(c-244.35,4049.5) -244.35,4073.18 ccw(c-244.36,4096.87) C14.1@-227.61,4080.12 ; C14.1@-224.78,4069.07 ccw(c-234.7,4059.15) -234.7,4073.18 ccw(c-234.7,4087.21) C14.1@-224.78,4077.29
NetC15_1: C15.1 R12.1 | length 172.9
  Bottom Layer w4: R12.1@-278.82,4128.64 C15.1@-220.67,4128.64 ; R12.1@-275.06,4124.87 cw(c-265.98,4115.8) -265.98,4128.64 cw(c-265.98,4141.48) R12.1@-275.06,4132.4 ; R12.1@-272.23,4122.05 cw(c-256.32,4106.14) -256.32,4128.64 cw(c-256.32,4151.13) R12.1@-272.23,4135.23 ; C15.1@-227.61,4121.7 ccw(c-244.35,4104.95) -244.35,4128.64 ccw(c-244.36,4152.32) C15.1@-227.61,4135.57 ; C15.1@-224.78,4124.53 ccw(c-234.7,4114.61) -234.7,4128.64 ccw(c-234.7,4142.67) C15.1@-224.78,4132.75
NetC16_1: C16.1 R13.1 | length 172.9
  Bottom Layer w4: R13.1@-278.82,4184.09 C16.1@-220.67,4184.09 ; R13.1@-275.06,4180.33 cw(c-265.98,4171.25) -265.98,4184.09 cw(c-265.98,4196.93) R13.1@-275.06,4187.85 ; R13.1@-272.23,4177.5 cw(c-256.32,4161.59) -256.32,4184.09 cw(c-256.32,4206.59) R13.1@-272.23,4190.68 ; C16.1@-227.61,4177.15 ccw(c-244.35,4160.41) -244.35,4184.09 ccw(c-244.36,4207.78) C16.1@-227.61,4191.03 ; C16.1@-224.78,4179.98 ccw(c-234.7,4170.06) -234.7,4184.09 ccw(c-234.7,4198.12) C16.1@-224.78,4188.2
NetC17_1: C17.1 R15.1 | length 267.9
  Bottom Layer w4: C17.1@-320.67,4285.19 cw(c-320.67,4261.5) -303.92,4278.25 cw(c-287.17,4295) C17.1@-310.86,4295 ; C17.1@-320.67,4289.19 cw(c-320.67,4275.16) -310.75,4285.08 cw(c-300.83,4295) C17.1@-314.86,4295 ; C17.1@-320.67,4295 -278.82,4253.15 ; -304,4278.33 cw(c-342.29,4240.04) R15.1@-288.14,4240.04 ; -297.17,4271.5 cw(c-328.63,4240.04) R15.1@-284.14,4240.04 ; -290.34,4264.67 cw(c-314.98,4240.04) R15.1@-280.14,4240.04 ; -283.51,4257.84 cw(c-301.32,4240.04) R15.1@-276.14,4240.04 ; R15.1@-281.88,4248.84 ccw(c-283.38,4253.15) -278.82,4253.15 ; R15.1@-278.82,4239.55 -278.82,4253.15 ; R15.1@-275.76,4248.84 cw(c-274.25,4253.15) -278.82,4253.15
NetC17_2: C17.2 C18.1 R14.2 | length 305.9
  Bottom Layer w4: C17.2@-279.33,4295 R14.2@-221.18,4295 -221.18,4257.55 -220.67,4257.04 ; C17.2@-275.22,4290.89 cw(c-265.3,4280.97) -265.3,4295 ; C17.2@-275.22,4299.11 ccw(c-265.3,4309.03) -265.3,4295 ; C17.2@-272.39,4288.06 cw(c-255.65,4271.32) -255.65,4295 cw(c-255.64,4318.69) C17.2@-272.39,4301.94 ; R14.2@-227.77,4287.92 cw(c-243.68,4272.01) -221.18,4272.01 cw(c-198.68,4272.01) R14.2@-214.59,4287.92 ; R14.2@-227.77,4288.41 ccw(c-243.68,4272.5) -243.68,4295 ccw(c-243.68,4317.5) R14.2@-227.77,4301.59 ; C18.1@-225.79,4247.92 ccw(c-231.36,4257.04) -220.67,4257.04 ; R14.2@-224.94,4290.75 cw(c-234.02,4281.67) -221.18,4281.67 cw(c-208.34,4281.67) R14.2@-217.42,4290.75 ; R14.2@-224.94,4291.24 ccw(c-234.02,4282.16) -234.02,4295 ccw(c-234.02,4307.84) R14.2@-224.94,4298.76 ; C18.1@-220.67,4239.55 -220.67,4257.04 ; C18.1@-215.55,4247.92 cw(c-209.98,4257.04) -220.67,4257.04
NetC23_1: C23.1 C24.2 U1.18 | length 714.1
  Top Layer w4: U1.18@-79.84,2683.82 -35,2683.82 -23.82,2695 15,2695 23.52,2686.48 v1(23.52,2591.71) ; U1.18@-60.1,2680.22 cw(c-51.42,2671.54) -51.42,2683.82 cw(c-51.42,2696.1) U1.18@-60.1,2687.42 ; v1@16.81,2598.43 ccw(c0.59,2614.64) 23.52,2614.64 ccw(c46.46,2614.64) v1@30.24,2598.43 ; v1@19.64,2595.6 ccw(c10.25,2604.99) 23.52,2604.99 ccw(c36.8,2604.99) v1@27.41,2595.6
  Bottom Layer w4: v1(23.52,2591.71) 38.86,2591.71 42.15,2595 C24.2@89.33,2595 89.33,2568.74 ; C23.1@68.65,2528.72 cw(c83.99,2538.03) 71.31,2550.72 ; C23.1@70.63,2525 70.63,2550.04 89.33,2568.74 ; C23.1@72.07,2530.8 cw(c88.48,2540.75) 74.91,2554.32 ; C23.1@75.49,2532.87 cw(c92.97,2543.47) 78.52,2557.93 ; C23.1@78.91,2534.94 cw(c97.46,2546.19) 82.12,2561.53 ; C23.1@82.33,2537.02 cw(c101.95,2548.91) 85.73,2565.14 ; C24.2@82.39,2601.94 cw(c65.64,2618.69) 65.64,2595 cw(c65.65,2571.31) 82.39,2588.06 cw(c65.64,2571.31) 89.33,2571.31 cw(c113.02,2571.32) C24.2@96.27,2588.06 ; C24.2@85.22,2599.11 cw(c75.3,2609.03) 75.3,2595 cw(c75.3,2580.97) 85.22,2590.89 cw(c75.3,2580.97) 89.33,2580.97 cw(c103.36,2580.97) C24.2@93.44,2590.89 ; C23.1@85.75,2539.09 cw(c106.44,2551.64) 89.33,2568.74
NetC25_1: C25.1 C26.1 U1.17 | length 646.4
  Top Layer w4: U1.17@-79.84,2658.62 -43.43,2658.62 -34.81,2650 -34.81,2600 16.86,2548.33 v1(16.86,2523.37) ; U1.17@-60.1,2655.03 cw(c-51.42,2646.34) -51.42,2658.62 cw(c-51.42,2670.9) U1.17@-60.1,2662.22 ; v1@10.14,2530.09 ccw(c-6.08,2546.31) 16.86,2546.31 ccw(c39.79,2546.31) v1@23.57,2530.09 ; v1@12.97,2527.26 ccw(c3.58,2536.65) 16.86,2536.65 ccw(c30.14,2536.65) v1@20.75,2527.26
  Bottom Layer w4: v1@12.32,2515.03 cw(c8.18,2507.4) 16.86,2507.4 ; v1(16.86,2523.37) 16.86,2507.4 ; v1@21.39,2515.03 ccw(c25.53,2507.4) 16.86,2507.4 ; C25.1@58.12,2403.06 ccw(c27.93,2433.25) 70.63,2433.25 ccw(c113.32,2433.25) C25.1@83.14,2403.06 ; C25.1@60.95,2400.23 ccw(c37.59,2423.59) 70.63,2423.59 ccw(c103.67,2423.59) C25.1@80.31,2400.23 ; C25.1@63.78,2397.4 ccw(c47.25,2413.93) 70.63,2413.93 ccw(c94.01,2413.93) C25.1@77.48,2397.4 ; C25.1@70.63,2385.63 70.63,2453.63 ; C26.1@80.76,2450.85 ccw(c72.63,2446.32) 72.63,2455.63 ; C26.1@80.76,2460.41 cw(c72.63,2464.94) 72.63,2455.63 ; C26.1@89.33,2455.63 72.63,2455.63 ; 16.86,2507.4 70.63,2453.63 ; 70.63,2453.63 72.63,2455.63
NetC27_1: C27.1 C28.1 U1.15 | length 505.3
  Top Layer w4: v1@-124.33,2608.23 U1.15@-79.84,2608.23 ; v1@-120.59,2604.49 cw(c-111.55,2595.45) -111.55,2608.23 ; v1@-120.59,2612.26 ccw(c-110.84,2622.01) -110.84,2608.23 ; v1@-117.76,2601.66 cw(c-101.9,2585.79) U1.15@-101.9,2608.23 ; v1@-117.76,2615.09 ccw(c-101.19,2631.66) U1.15@-101.19,2608.23 ; U1.15@-99.58,2604.63 ccw(c-108.26,2595.95) -108.26,2608.23 ccw(c-108.27,2620.51) U1.15@-99.58,2611.83
  Bottom Layer w4: v1(-124.48,2608.37) -109.04,2608.37 ; C27.1@-117.68,2547.29 ccw(c-118.45,2551.3) -114.37,2551.3 ; C27.1@-116.34,2528.71 cw(c-100.16,2538.65) -113.59,2552.08 ; C27.1@-114.37,2525 -114.37,2551.3 ; C27.1@-112.93,2530.8 cw(c-95.72,2541.38) -110.01,2555.66 ; C27.1@-111.06,2547.29 cw(c-110.29,2551.3) -114.37,2551.3 ; C27.1@-109.53,2532.9 cw(c-91.28,2544.11) -106.42,2559.25 ; C27.1@-106.12,2534.99 cw(c-86.84,2546.83) -102.84,2562.83 ; C28.1@-105.34,2596.68 ccw(c-118.47,2598.95) -109.04,2608.37 ; C27.1@-102.71,2537.08 cw(c-82.4,2549.56) -99.25,2566.42 ; C28.1@-102.61,2588.06 cw(c-119.36,2571.31) -95.67,2571.31 cw(c-71.98,2571.31) C28.1@-88.73,2588.06 ; C28.1@-99.78,2590.89 cw(c-109.7,2580.97) -95.67,2580.97 cw(c-81.64,2580.97) C28.1@-91.56,2590.89 ; C27.1@-99.3,2539.18 cw(c-77.96,2552.29) -95.67,2570 ; C28.1@-97.34,2604.67 cw(c-99.62,2617.8) -109.04,2608.37 ; -114.37,2551.3 -95.67,2570 C28.1@-95.67,2595 -109.04,2608.37
NetC27_2: C27.2 R22.2 R25.2 | length 476.4
  Bottom Layer w4: R22.2@-102.77,2647.08 ccw(c-118.68,2662.99) -96.18,2662.99 ccw(c-73.68,2662.99) R22.2@-89.59,2647.08 ; R25.2@-102.77,2677.92 cw(c-118.68,2662.01) -96.18,2662.01 cw(c-73.68,2662.01) R25.2@-89.59,2677.92 ; R22.2@-99.94,2644.25 ccw(c-109.02,2653.33) -96.18,2653.33 ccw(c-83.34,2653.33) R22.2@-92.42,2644.25 ; R25.2@-99.94,2680.75 cw(c-109.02,2671.67) -96.18,2671.67 cw(c-83.34,2671.67) R25.2@-92.42,2680.75 ; R22.2@-98.72,2640.38 ccw(c-87.06,2636.36) -95.78,2627.64 ; R25.2@-96.18,2685 R22.2@-96.18,2640 -96.18,2628.04 -76.48,2608.34 -76.48,2580 -66.48,2570 -40,2570 -35.63,2565.63 ; R22.2@-94.93,2639.08 ccw(c-80.33,2634.04) -91.26,2623.12 ; R22.2@-91.15,2637.77 ccw(c-73.61,2631.72) -86.73,2618.59 ; R22.2@-87.37,2636.47 ccw(c-66.88,2629.4) -82.21,2614.07 ; C27.2@-46.35,2543.99 ccw(c-62.83,2565.63) -35.63,2565.63 ; C27.2@-43.92,2540.81 ccw(c-56.68,2557.55) -35.63,2557.55 ccw(c-14.58,2557.55) C27.2@-27.34,2540.81 ; C27.2@-35.63,2525 -35.63,2565.63 ; C27.2@-24.91,2543.99 cw(c-8.43,2565.63) -35.63,2565.63
NetC31_1: C31.1 C32.1 U1.16 | length 548.5
  Top Layer w4: v1@-166.53,2731.66 cw(c-182.74,2715.44) -159.81,2715.44 cw(c-136.87,2715.44) v1@-153.09,2731.66 ; v1@-163.7,2734.49 cw(c-173.09,2725.1) -159.81,2725.1 cw(c-146.53,2725.1) v1@-155.92,2734.49 ; v1(-159.81,2738.37) -159.81,2665.37 -127.86,2633.42 U1.16@-79.84,2633.43 ; U1.16@-99.58,2629.83 ccw(c-108.26,2621.15) -108.26,2633.42 ccw(c-108.27,2645.71) U1.16@-99.58,2637.02
  Bottom Layer w4: v1(-159.81,2738.37) -138.18,2760 ; v1@-159.81,2743.87 ccw(c-159.81,2757.15) -150.42,2747.76 ccw(c-141.03,2738.37) v1@-154.31,2738.37 ; v1@-159.81,2747.87 ccw(c-159.81,2770.81) -143.59,2754.59 ccw(c-127.37,2738.37) v1@-150.31,2738.37 ; C31.1@-131.3,2754.89 ccw(c-138.18,2752.81) -138.18,2760 ; C31.1@-131.3,2765.11 cw(c-138.18,2767.19) -138.18,2760 ; C31.1@-120.33,2781.57 ccw(c-123.37,2790.04) -114.37,2790.04 ; C31.1@-114.37,2760 -138.18,2760 ; C31.1@-108.41,2781.57 cw(c-105.37,2790.04) -114.37,2790.04 ; C32.1@-102.61,2830.56 cw(c-119.36,2813.81) -95.67,2813.81 cw(c-71.98,2813.82) C32.1@-88.73,2830.56 ; C32.1@-99.78,2833.39 cw(c-109.7,2823.47) -95.67,2823.47 cw(c-81.64,2823.47) C32.1@-91.56,2833.39 ; C32.1@-95.67,2837.5 -95.67,2808.74 -114.37,2790.04 ; -138.18,2760 -126.28,2771.91 -114.37,2783.81 -114.37,2790.04
NetC31_2: C31.2 R26.2 R27.2 | length 495.2
  Bottom Layer w4: R26.2@-102.77,2898.33 ccw(c-118.68,2914.24) -96.18,2914.24 ccw(c-73.68,2914.24) R26.2@-89.59,2898.33 ; R27.2@-102.77,2937.92 cw(c-118.68,2922.01) -96.18,2922.01 cw(c-73.68,2922.01) R27.2@-89.59,2937.92 ; R26.2@-100.65,2882.58 cw(c-104.77,2875.04) -96.18,2875.04 ; R26.2@-99.94,2895.5 ccw(c-109.02,2904.58) -96.18,2904.58 ccw(c-83.34,2904.58) R26.2@-92.42,2895.5 ; R27.2@-99.94,2940.75 cw(c-109.02,2931.67) -96.18,2931.67 cw(c-83.34,2931.67) R27.2@-92.42,2940.75 ; R27.2@-96.18,2945 R26.2@-96.18,2891.25 -96.18,2875.04 ; R26.2@-91.71,2882.58 ccw(c-87.59,2875.04) -96.18,2875.04 ; -66.32,2796.32 cw(c-97.72,2764.92) C31.2@-53.31,2764.92 ; -64.61,2794.61 ccw(c-35.63,2823.59) C31.2@-35.63,2782.61 ; -59.49,2789.49 cw(c-84.06,2764.92) C31.2@-49.31,2764.92 ; -57.78,2787.78 ccw(c-35.63,2809.93) C31.2@-35.63,2778.61 ; C31.2@-52.66,2782.66 cw(c-70.41,2764.92) C31.2@-45.31,2764.92 ; C31.2@-50.95,2780.95 ccw(c-35.63,2796.28) C31.2@-35.63,2774.61 ; C31.2@-35.63,2760 -35.63,2765.63 -76.48,2806.48 -76.48,2855.34 -96.18,2875.04
NetC38_1: C38.1 J12.2 J12.3 J12.4 R36.1 | length 2397.9
  Bottom Layer w12: R36.1@3829,1158.82 3798.82,1158.82 3790,1150 3790,1065 3800.67,1054.33 C38.1@3829,1054.33 3829,800 3829,730 3859.61,699.39 3989.39,699.39 ; J12.3@3970.43,668.42 ccw(c3954.13,697.19) 3987.19,697.19 ; J12.3@3987.19,608.84 3987.19,697.19 ; J12.3@4003.95,668.42 cw(c4020.26,697.19) 3987.19,697.19 ; J12.4@4131.93,659.09 ccw(c4034.64,561.8) 4034.64,699.39 ccw(c4034.64,836.98) J12.4@4131.93,739.69 ; J12.4@4140.42,667.58 ccw(c4063.61,590.77) 4063.61,699.39 ccw(c4063.61,808.01) J12.4@4140.42,731.21 ; J12.4@4148.9,676.06 ccw(c4092.58,619.74) 4092.58,699.39 ccw(c4092.58,779.04) J12.4@4148.9,722.72 ; J12.4@4193.52,699.39 J12.4@4187.98,699.39 ; J12.4@4227.06,676.06 cw(c4283.38,619.74) 4283.38,699.39 cw(c4283.38,779.04) J12.4@4227.06,722.72 ; J12.4@4235.54,667.58 cw(c4312.35,590.77) 4312.35,699.39 cw(c4312.35,808.01) J12.4@4235.54,731.21 ; J12.4@4244.03,659.09 cw(c4341.32,561.8) 4341.32,699.39 cw(c4341.32,836.98) J12.4@4244.03,739.69 ; J12.2@4374.92,669.89 ccw(c4365.4,691.23) 4388.77,691.23 ; J12.2@4388.77,608.84 4388.77,691.23 ; J12.2@4402.61,669.89 cw(c4412.13,691.23) 4388.77,691.23 ; 3987.19,697.19 3989.39,699.39 ; 3989.39,699.39 4015,699.39 J12.4@4187.98,699.39 ; J12.4@4187.98,699.39 4380.61,699.39 4388.77,691.23
NetC38_2: C38.2 D1.1 D2.3 R37.2 | length 1022.6
  Bottom Layer w4: C38.2@3829,1095.67 3854.33,1095.67 3875,1075 3900.79,1075 ; C38.2@3833.11,1091.56 cw(c3843.03,1081.64) 3843.03,1095.67 cw(c3843.03,1109.7) C38.2@3833.11,1099.78 ; C38.2@3835.94,1088.73 cw(c3852.69,1071.98) 3852.69,1095.67 cw(c3852.69,1119.36) C38.2@3835.94,1102.61 ; D2.3@3889.67,1036.11 ccw(c3862.84,1062.94) 3900.79,1062.94 ccw(c3938.73,1062.94) D2.3@3911.9,1036.11 ; D1.1@3889.67,1106.49 cw(c3862.84,1079.66) 3900.79,1079.66 cw(c3938.73,1079.65) D1.1@3911.9,1106.49 ; D2.3@3892.5,1033.28 ccw(c3872.5,1053.29) 3900.79,1053.29 ccw(c3929.07,1053.29) D2.3@3909.07,1033.28 ; D1.1@3892.5,1109.31 cw(c3872.5,1089.31) 3900.79,1089.31 cw(c3929.07,1089.31) D1.1@3909.07,1109.31 ; D2.3@3895.33,1030.46 ccw(c3882.16,1043.63) 3900.79,1043.63 ccw(c3919.42,1043.63) D2.3@3906.24,1030.46 ; D1.1@3895.33,1112.14 cw(c3882.16,1098.97) 3900.79,1098.97 cw(c3919.42,1098.97) D1.1@3906.24,1112.14 ; D1.1@3900.79,1117.6 3900.79,1075 ; D2.3@3907.23,1019.54 cw(c3920.4,1006.37) 3920.4,1025 cw(c3920.4,1043.63) D2.3@3907.23,1030.46 ; D2.3@3910.06,1016.72 cw(c3930.06,996.71) 3930.06,1025 cw(c3930.06,1053.29) D2.3@3910.06,1033.28 ; D2.3@3912.88,1013.89 cw(c3939.71,987.06) 3939.71,1025 cw(c3939.72,1062.94) D2.3@3912.88,1036.11 ; R37.2@4159.91,956.08 ccw(c4144,971.99) 4166.5,971.99 ccw(c4189,971.99) R37.2@4173.09,956.08 ; R37.2@4162.74,953.25 ccw(c4153.66,962.33) 4166.5,962.33 ccw(c4179.34,962.33) R37.2@4170.26,953.25 ; R37.2@4166.5,949 4166.5,1013.5 4155,1025 D2.3@3900.79,1025 3900.79,1075
NetC43_1: C43.1 R48.2 R49.2 | length 335.6
  Bottom Layer w4: C43.1@2145.67,6045 C43.1@2146.3,6044.37
  Bottom Layer w12: C43.1@2146.3,6044.37 R49.2@2210,6044.37 R48.2@2303.31,6044.37 ; C43.1@2149.78,6040.89 cw(c2158.18,6032.49) 2158.18,6044.37 ; C43.1@2149.78,6049.11 ccw(c2161.22,6060.55) 2161.22,6044.37 ; R49.2@2195.4,6034.69 ccw(c2172.04,6011.33) 2172.04,6044.37 ccw(c2172.04,6077.41) R49.2@2195.4,6054.05 ; R49.2@2224.6,6034.69 cw(c2247.96,6011.33) 2247.96,6044.37 cw(c2247.96,6077.41) R49.2@2224.6,6054.05 ; R48.2@2288.71,6034.69 ccw(c2265.35,6011.33) 2265.35,6044.37 ccw(c2265.35,6077.41) R48.2@2288.71,6054.05
NetC48_2: C48.2 R54.1 R55.1 | length 357.7
  Bottom Layer w4: C48.2@2568.7,6044.37 2571.83,6047.5 C48.2@2574.33,6050
  Bottom Layer w12: R54.1@2396.69,6044.37 R55.1@2490,6044.37 C48.2@2568.7,6044.37 ; R54.1@2411.29,6034.69 cw(c2434.65,6011.33) 2434.65,6044.37 cw(c2434.65,6077.41) R54.1@2411.29,6054.05 ; R55.1@2475.4,6034.69 ccw(c2452.04,6011.33) 2452.04,6044.37 ccw(c2452.04,6077.41) R55.1@2475.4,6054.05 ; R55.1@2504.6,6034.69 cw(c2527.96,6011.33) 2527.96,6044.37 cw(c2527.96,6077.41) R55.1@2504.6,6054.05 ; 2558.78,6044.37 ccw(c2558.78,6060.55) C48.2@2570.22,6049.11 ; 2561.82,6044.37 cw(c2561.82,6032.49) C48.2@2570.22,6040.89
NetC97_2: C97.2 U21.39 | length 151.1
  Bottom Layer w4: C97.2@5054.33,5795.19 cw(c5054.33,5771.5) 5071.08,5788.25 cw(c5087.83,5805) C97.2@5064.14,5805 ; C97.2@5054.33,5799.19 cw(c5054.33,5785.16) 5064.25,5795.08 cw(c5074.17,5805) C97.2@5060.14,5805 ; C97.2@5054.33,5805 5076.1,5783.23 U21.39@5076.1,5737.32 ; U21.39@5073.27,5763.68 ccw(c5066.45,5770.51) 5076.1,5770.51 ccw(c5085.76,5770.51) U21.39@5078.93,5763.68
NetC100_1: C100.1 U21.37 | length 214.2
  Bottom Layer w4: C100.1@4920.67,5680 4977.99,5737.32 U21.37@5036.73,5737.32 ; C100.1@4920.67,5685.81 ccw(c4920.67,5699.84) 4930.59,5689.92 ccw(c4940.51,5680) C100.1@4926.48,5680 ; C100.1@4920.67,5689.81 ccw(c4920.67,5713.5) 4937.42,5696.75 ccw(c4954.17,5680) C100.1@4930.48,5680 ; U21.37@5033.9,5734.49 ccw(c5027.08,5727.67) 5027.08,5737.32 ccw(c5027.08,5746.98) U21.37@5033.9,5740.15
NetC101_1: C101.1 R133.2 U24.7 U25.5 | length 1544.9
  Top Layer w4: R133.2@1720.46,5267.08 ccw(c1704.55,5282.99) 1727.05,5282.99 ccw(c1749.54,5282.99) R133.2@1733.64,5267.08 ; R133.2@1723.29,5264.25 ccw(c1714.21,5273.33) 1727.05,5273.33 ccw(c1739.89,5273.33) R133.2@1730.81,5264.25 ; R133.2@1727.05,5260 1727.05,5322.94 v4(1768.8,5364.68) U24.7@1824.29,5364.68 ; v4@1758.99,5364.68 cw(c1735.3,5364.68) 1752.05,5347.94 cw(c1768.8,5331.19) v4@1768.8,5354.87 ; v4@1762.99,5364.68 cw(c1748.96,5364.68) 1758.88,5354.76 cw(c1768.8,5344.84) v4@1768.8,5358.87 ; v4@1772.91,5360.58 cw(c1782.83,5350.66) 1782.83,5364.68 cw(c1782.83,5378.71) v4@1772.91,5368.79 ; v4@1775.73,5357.75 cw(c1792.48,5341) 1792.48,5364.68 cw(c1792.48,5388.37) v4@1775.73,5371.62 ; U24.7@1794,5361.86 ccw(c1787.17,5355.03) 1787.17,5364.68 ccw(c1787.17,5374.34) U24.7@1794,5367.51 ; v4(2065,5505) 2105.19,5505 2130.19,5480 2130.19,5443.24 2140.62,5432.81 2145.85,5432.81 2178.79,5399.87 2258.54,5399.87 2273.73,5384.68 2273.73,5356.27 2285.59,5344.41 ; v4@2069.11,5500.89 cw(c2079.03,5490.97) 2079.03,5505 cw(c2079.03,5519.03) v4@2069.11,5509.11 ; v4@2071.94,5498.06 cw(c2088.69,5481.31) 2088.69,5505 cw(c2088.69,5528.69) v4@2071.94,5511.94 ; U25.5@2294.65,5340.43 ccw(c2285.59,5332.1) 2285.59,5344.41 ; U25.5@2294.65,5348.39 cw(c2285.59,5356.72) 2285.59,5344.41 ; U25.5@2320.85,5340.26 cw(c2330.87,5330.23) 2330.87,5344.41 cw(c2330.88,5358.59) U25.5@2320.85,5348.56 ; C101.1@2378.26,5408.06 cw(c2361.51,5391.31) 2385.2,5391.31 cw(c2408.88,5391.32) C101.1@2392.13,5408.06 ; C101.1@2381.09,5410.89 cw(c2371.17,5400.97) 2385.2,5400.97 cw(c2399.22,5400.97) C101.1@2389.31,5410.89 ; C101.1@2385.2,5415 2385.2,5356.08 2373.53,5344.41 U25.5@2307.83,5344.41 2285.59,5344.41
  MidLayer1 w4: v4(1768.8,5364.68) 1791.92,5387.81 2017.81,5387.81 2030,5400 2030,5495 2040,5505 v4(2065,5505) ; v4@1768.8,5370.5 ccw(c1768.8,5384.52) 1778.72,5374.6 ccw(c1788.64,5364.68) v4@1774.61,5364.68 ; v4@1768.8,5374.5 ccw(c1768.8,5398.18) 1785.55,5381.43 ccw(c1802.29,5364.68) v4@1778.61,5364.68 ; v4@2058.06,5498.06 ccw(c2041.31,5481.31) 2041.31,5505 ccw(c2041.31,5528.69) v4@2058.06,5511.94 ; v4@2060.89,5500.89 ccw(c2050.97,5490.97) 2050.97,5505 ccw(c2050.97,5519.03) v4@2060.89,5509.11
NetC102_1: C102.1 R134.2 U24.6 U25.4 | length 1681.8
  Top Layer w4: R134.2@1720.66,5407.72 cw(c1706.78,5392.95) 1727.05,5392.95 cw(c1747.31,5392.95) R134.2@1733.43,5407.72 ; R134.2@1723.4,5410.63 cw(c1715.48,5402.21) 1727.05,5402.21 cw(c1738.61,5402.21) R134.2@1730.69,5410.63 ; R134.2@1727.05,5415 1727.05,5390 1735,5382.05 ; v4@1728.43,5367.29 ccw(c1715.14,5382.05) 1735,5382.05 ; v4@1731.11,5364.32 ccw(c1723.23,5373.06) 1735,5373.06 ccw(c1746.77,5373.06) v4@1738.89,5364.32 ; v4@1735,5365.81 ccw(c1735,5379.84) 1744.92,5369.92 ccw(c1754.84,5360) v4@1740.81,5360 ; v4@1735,5369.81 ccw(c1735,5393.5) 1751.75,5376.75 ccw(c1768.5,5360) v4@1744.81,5360 ; v4@1741.57,5367.29 cw(c1754.86,5382.05) 1735,5382.05 ; U24.6@1794,5381.54 ccw(c1787.17,5374.71) 1787.17,5384.37 ccw(c1787.17,5394.03) U24.6@1794,5387.2 ; U24.6@1824.29,5384.37 1759.37,5384.37 v4(1735,5360) 1735,5382.05 ; v4@1928.06,5346.94 ccw(c1911.31,5363.69) 1935,5363.69 ccw(c1958.69,5363.69) v4@1941.94,5346.94 ; v4@1930.89,5344.11 ccw(c1920.97,5354.03) 1935,5354.03 ccw(c1949.03,5354.03) v4@1939.11,5344.11 ; v4(1935,5340) 1935,5390 1945,5400 2043.07,5400 2072.37,5429.29 2075.88,5432.81 2103.49,5432.81 2107,5429.3 2107,5408.43 2123.56,5391.87 2255.22,5391.87 2265.73,5381.37 2265.73,5352.95 2299.87,5318.82 U25.4@2307.83,5318.82 2388.08,5318.82 2406.86,5300.04 2406.86,5245.71 2414.86,5237.71 2549.24,5237.71 C102.1@2571.54,5260 ; 2288.32,5330.37 cw(c2276.77,5318.82) U25.4@2293.1,5318.82 ; 2290.47,5328.22 ccw(c2298.98,5336.72) U25.4@2298.98,5324.69 ; U25.4@2320.85,5314.67 cw(c2330.87,5304.64) 2330.87,5318.82 cw(c2330.87,5333) U25.4@2320.85,5322.97 ; C102.1@2561.72,5260 cw(c2538.04,5260) 2554.79,5243.25 cw(c2571.54,5226.5) C102.1@2571.54,5250.19 ; C102.1@2565.72,5260 cw(c2551.7,5260) 2561.62,5250.08 cw(c2571.54,5240.16) C102.1@2571.54,5254.19
  MidLayer2 w4: v4@1735,5350.19 cw(c1735,5326.5) 1751.75,5343.25 cw(c1768.5,5360) v4@1744.81,5360 ; v4@1735,5354.19 cw(c1735,5340.16) 1744.92,5350.08 cw(c1754.84,5360) v4@1740.81,5360 ; v4(1735,5360) 1755,5340 v4(1935,5340) ; v4@1928.06,5333.06 ccw(c1911.31,5316.31) 1911.31,5340 ccw(c1911.31,5363.69) v4@1928.06,5346.94 ; v4@1930.89,5335.89 ccw(c1920.97,5325.97) 1920.97,5340 ccw(c1920.97,5354.03) v4@1930.89,5344.11
NetC103_1: C103.1 R135.2 U24.5 U25.3 | length 722.7
  Top Layer w4: U24.5@1985.71,5384.37 2089.69,5384.39 R135.2@2089.68,5415 2099,5405.68 2099,5405.11 2120.24,5383.87 2251.91,5383.87 2257.73,5378.05 2257.73,5349.64 2265.19,5342.18 2265.19,5327.04 2257.97,5319.82 ; U24.5@2016,5381.54 cw(c2022.84,5374.7) 2022.84,5384.38 cw(c2022.82,5394.02) U24.5@2016,5387.2 ; R135.2@2083.1,5407.92 cw(c2067.19,5392.01) 2089.69,5392.01 cw(c2112.18,5392.01) R135.2@2096.27,5407.92 ; R135.2@2085.92,5410.75 cw(c2076.84,5401.67) 2089.69,5401.67 cw(c2102.53,5401.67) R135.2@2093.45,5410.75 ; U25.3@2235,5318.82 2256.97,5318.82 ; U25.3@2248.24,5314.91 cw(c2256.97,5307.13) 2256.97,5318.82 ; U25.3@2248.24,5322.73 ccw(c2256.97,5330.51) 2256.97,5318.82 ; 2368.45,5243.25 ccw(c2351.7,5260) C103.1@2375.39,5260 ; 2368.45,5243.25 cw(c2385.2,5226.5) C103.1@2385.2,5250.19 ; C103.1@2379.39,5260 cw(c2365.35,5260) 2375.28,5250.08 cw(c2385.2,5240.16) C103.1@2385.2,5254.19 ; C103.1@2385.2,5260 2366.91,5241.71 2336.08,5241.71 2257.97,5319.82 ; 2256.97,5318.82 2257.97,5319.82